# Altium PCB Pulsometro.PcbDoc
Units mil, origin at the board's own origin, x right, y up, seen from the top; angles counter-clockwise.
Board outline 6000 x 4000 mil, 2 copper layers (Top Layer, Bottom Layer); 21 components, 12 nets, 194 pads, 1 vias.
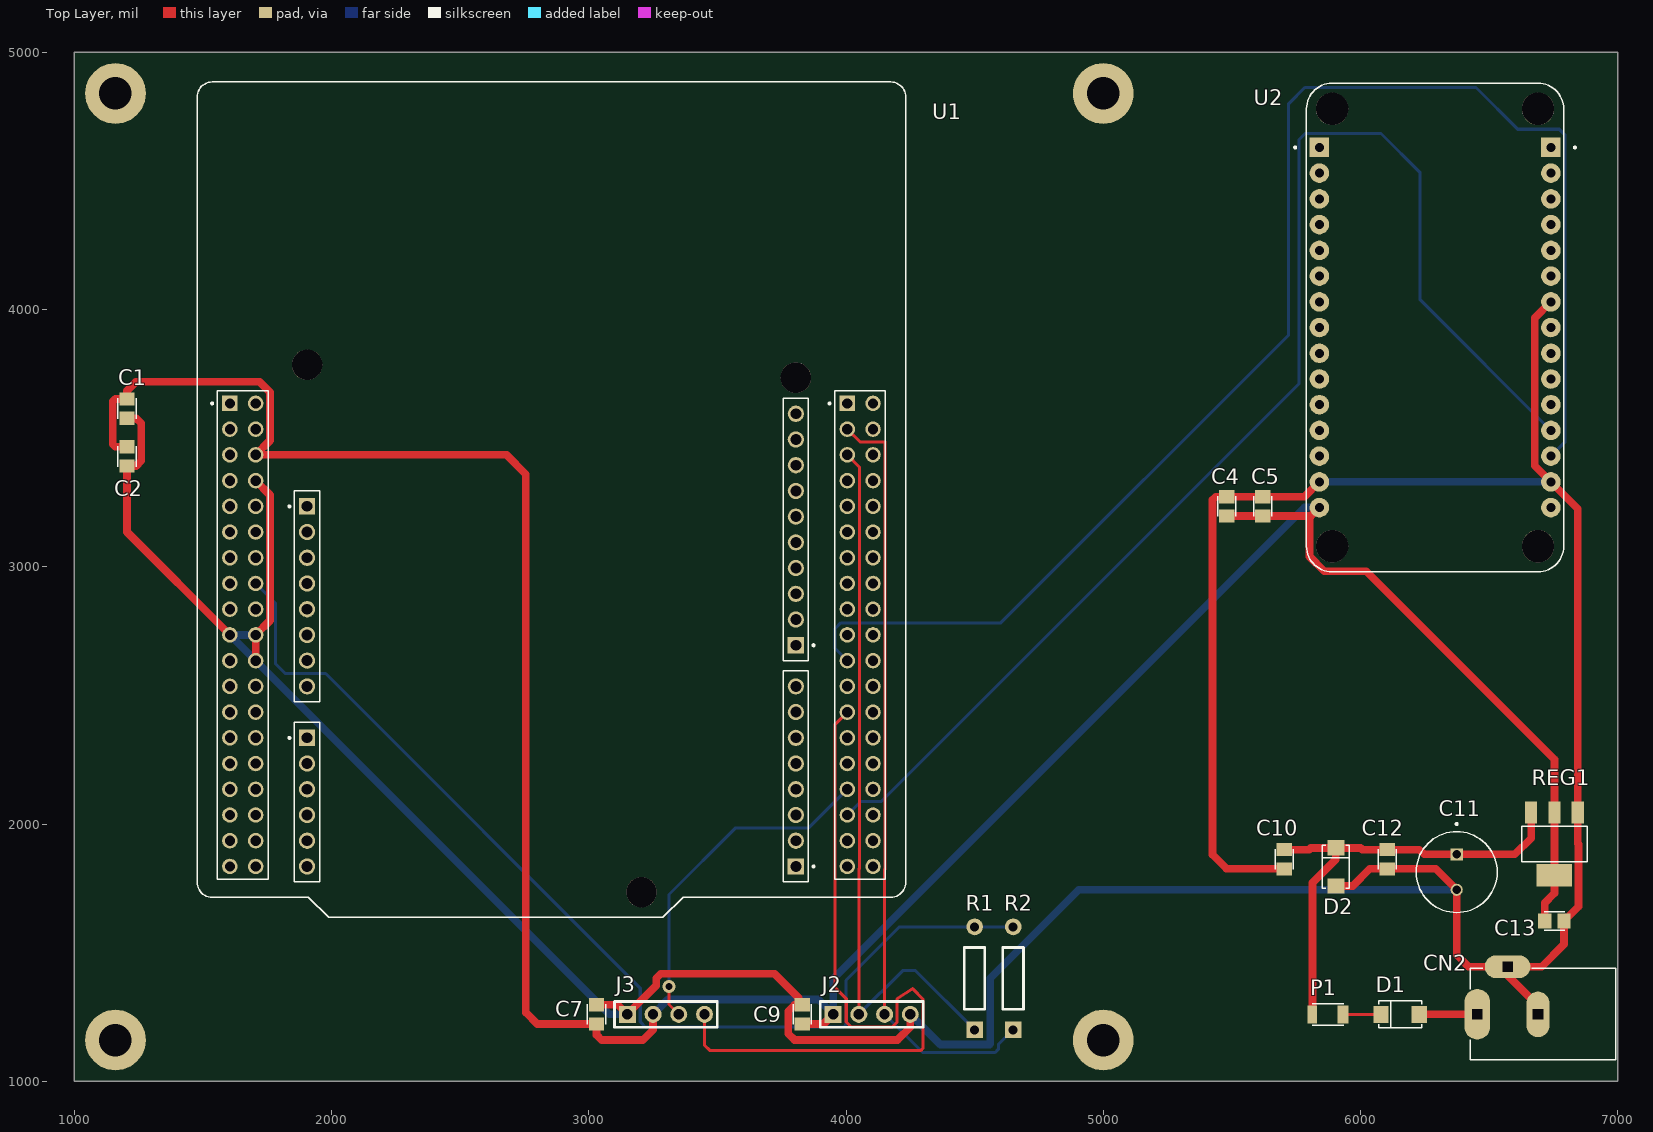
[diagram p0: Top Layer view]
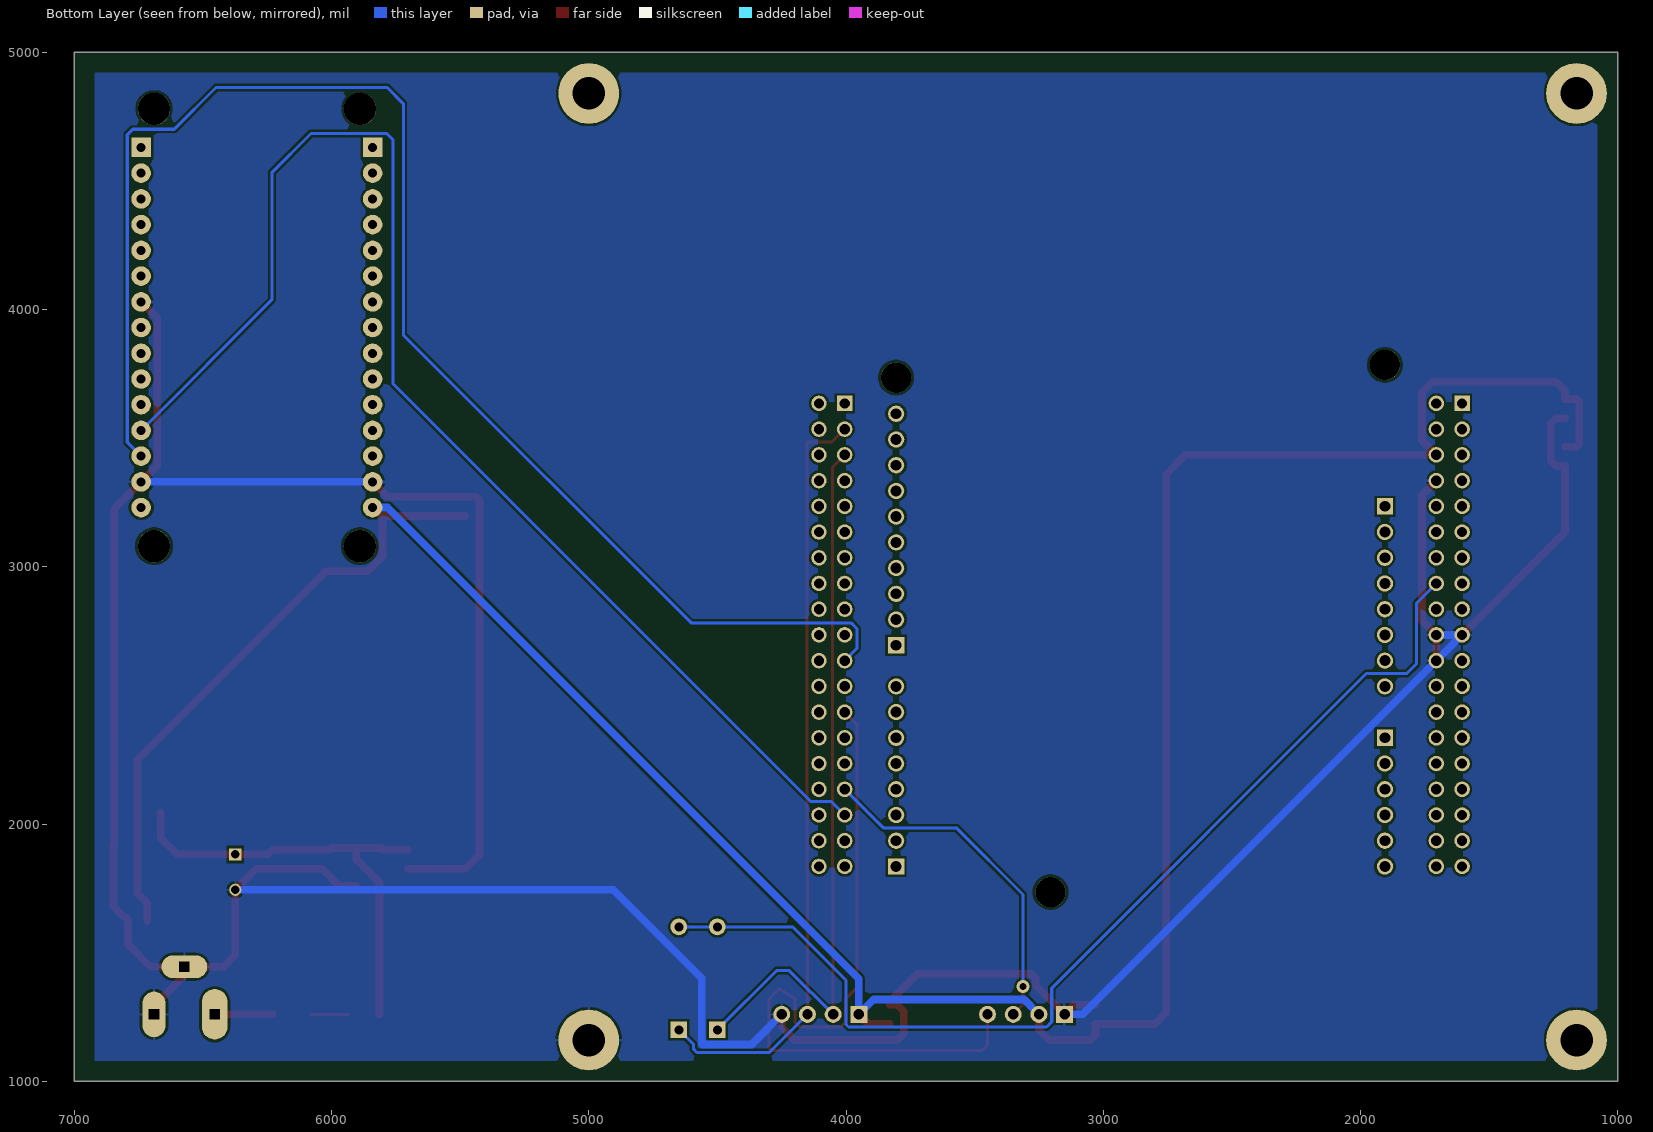
[diagram p1: Bottom Layer view, seen from below]
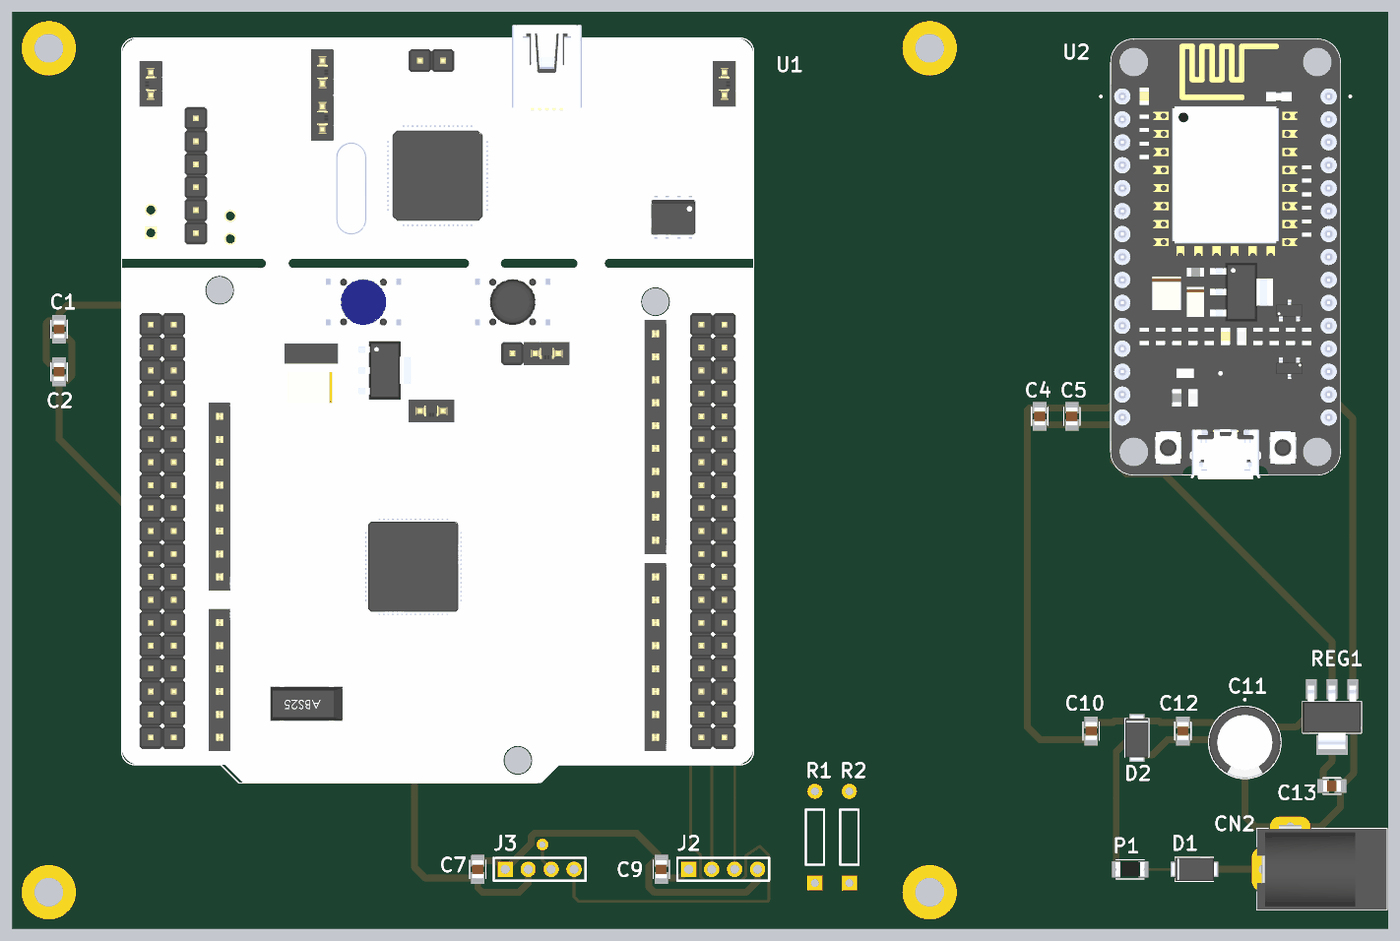
[diagram p2: 3D render of the assembled board from above, using the file's embedded part models]

## Layer stack, top to bottom
Top Solder: solder mask 0.4, Solder Resist, Dk 3.5
Top Layer: signal copper 1.4
Dielectric 1: dielectric 12.6, FR-4, Dk 4.8
Bottom Layer: signal copper 1.4
Bottom Solder: solder mask 0.4, Solder Resist, Dk 3.5

## Board outline
1000,1000 7000,1000 7000,5000 1000,5000

## Design rules (kind name [scope] priority, off if disabled: settings)
BoardOutlineClearance [OnCopper] p1: gap=78.74 ignorepadtopadclearanceinfootprint=FALSE except(0: Text-OutlineEdge; 10: SMDPad-OutlineEdge THPad-OutlineEdge)
Clearance [All] p1: gap=10 ignorepadtopadclearanceinfootprint=FALSE
HoleSize [All] p1: absolutevalues=TRUE maxlimit=200 minlimit=1 maxpercent=80.000 minpercent=20.000
PolygonConnect [All] p1: connectstyle=Relief reliefconductorwidth=10 reliefentries=4 polygonreliefangle="90 Angle" airgapwidth=10
RoutingVias [All] p1: holewidth=28 width=50 viastyle="Through Hole" minholewidth=28 minwidth=50 maxholewidth=28 maxwidth=50
SilkToSolderMaskClearance [IsPad] p1: minsilkscreentomaskgap=0 clearancetoexposedcopper=TRUE
SolderMaskExpansion [All] p1: expansion=0 istentingtop=FALSE
SupplyNets "Schematic Supply Nets_3" [InNet('+3V3')] p1: voltage=0.000
SupplyNets "Schematic Supply Nets_2" [InNet('+9V')] p2: voltage=0.000
SupplyNets "Schematic Supply Nets_1" [InNet('GND')] p3: voltage=0.000
SupplyNets "Schematic Supply Nets" [InNet('+5V')] p4: voltage=0.000
Width Width_Power [InNet('+9V') or InNet('NetC10_1') or InNet('+5V') or InNet('GND')] p1: maxlimit=50 minlimit=20 preferedwidth=30
Width [All] p2: maxlimit=50 minlimit=10 preferedwidth=12
28 further rules are at their usual default settings.

## Classes and differential pairs
component class Power: C10 C11 C12 C13 CN2 D1 D2 P1 REG1
component class HeartRate_SpO2_Monitor: U1
component class Alimentacion_Modulos: C1 C2 C4 C5 C7 C9 J2 J3 R1 R2 U2

## Components (designator, comment, footprint, x,y, rotation, side; value= is the part's Value field where it differs from the comment)
C1 "10µF 16 V X7R" C0805 1205,3615 r270 top locked
C2 "100 nF 50 V X7R" C0805 1205,3429 r270 top locked
C4 "10 µF 16 V X7R" C0805 5480,3235 r90 top locked
C5 "100 nF 50 V X7R" C0805 5620,3235 r90 top locked
C7 "100 nF 50 V X7R" C0805 3030,1260 r90 top locked
C9 "100 nF 50 V X7R" C0805 3830,1260 r90 top locked
C10 "100nF 50V X7R" C0805 5704,1863 r270 top locked
C11 "220uF 35V Elect" "Capacitor radial 8x11.5" 6374,1813 r270 top locked
C12 "1uF 25V X7R" C0805 6104,1863 r270 top locked
C13 "1uF 25V X7R" C0805 6754,1623 r0 top locked
CN2 "PJ-002BH" PJ-002BH 6454,1260 r0 top locked
D1 "S1G" "SMA (DO-214AC)" 6154,1260 r180 top locked
D2 "SMAJ12A" "SMA (DO-214AC)" 5904,1833 r90 top locked
J2 "Sensor MAX30102" CONN_1x4_2.54 4100,1260 r0 top locked
J3 "LCD 16x2 I2C" CONN_1x4_2.54 3300,1260 r0 top locked
P1 "NANOSMDC075F-2" NANOSMDC016F 5874,1260 r180 top locked
R1 "4k7 (DNP)" RES_AXIAL_P400 4500,1400 r90 top locked
R2 "4k7 (DNP)" RES_AXIAL_P400 4650,1400 r90 top locked
REG1 "LM7805" "SOT 223" 6754,1923 r180 top locked
U1 "NUCLEO-F446RE" MODULE_NUCLEO-F446RE 2855,3260.59 r0 top
U2 "" SEEED_113990105 6290,3930 r0 top locked

## Footprints (in the part's own frame and the unit in brackets; to place one, negate y for a bottom-side part, rotate by r counter-clockwise, add the part's x,y. Pads: shape width x height; smd on the part's side, far side on the other; paste and mask are expansions set on the pad)
C0805 [mm] "Capacitor 0805 (2012 mm)"
  rect 1.3x1.5 smd: 1(-0.95,0) 2(0.95,0)
  silkscreen extent -1,-0.9 1,0.9, body extent -1,-0.63 1,0.63, height 1.45
"Capacitor radial 8x11.5" [mm]
  rect 1.2x1.2 hole 0.85: 1(-1.75,0)
  round 1.2 hole 0.85: 2(1.75,0)
  silkscreen extent -4.85,-4 4,4, body extent -4,-4 4,4, height 11.5
CONN_1x4_2.54 [mil] "Tira de pines 1x4 paso 2.54 mm"
  rect 66x66 hole 40: 1(-150,0)
  round 66 hole 40: 2(-50,0) 3(50,0) 4(150,0)
  silkscreen extent -200,-50 200,50
MODULE_NUCLEO-F446RE [mm]
  rect 1.605x1.605 / inner round 1.605 / far side rect 1.605x1.605 hole 1.07: CN5_1(24.13,-14.37) CN6_1(-24.13,-0.65) CN8_1(-24.13,-23.51) CN9_1(24.13,-36.21)
  round 1.605 hole 1.07: CN5_2(24.13,-11.83) CN5_3(24.13,-9.29) CN5_4(24.13,-6.75) CN5_5(24.13,-4.21) CN5_6(24.13,-1.67) CN5_7(24.13,0.87) CN5_8(24.13,3.41) CN5_9(24.13,5.95) CN5_10(24.13,8.49) CN6_2(-24.13,-3.19) CN6_3(-24.13,-5.73) CN6_4(-24.13,-8.27) CN6_5(-24.13,-10.81) CN6_6(-24.13,-13.35) CN6_7(-24.13,-15.89) CN6_8(-24.13,-18.43) CN8_2(-24.13,-26.05) CN8_3(-24.13,-28.59) CN8_4(-24.13,-31.13) CN8_5(-24.13,-33.67) CN8_6(-24.13,-36.21) CN9_2(24.13,-33.67) CN9_3(24.13,-31.13) CN9_4(24.13,-28.59) CN9_5(24.13,-26.05) CN9_6(24.13,-23.51) CN9_7(24.13,-20.97) CN9_8(24.13,-18.43)
  rect 1.53x1.53 / inner round 1.53 / far side rect 1.53x1.53 hole 1.02: CN7_1(-31.75,9.51) CN10_1(29.21,9.51)
  round 1.53 hole 1.02: CN7_2(-29.21,9.51) CN7_3(-31.75,6.97) CN7_4(-29.21,6.97) CN7_5(-31.75,4.43) CN7_6(-29.21,4.43) CN7_7(-31.75,1.89) CN7_8(-29.21,1.89) CN7_9(-31.75,-0.65) CN7_10(-29.21,-0.65) CN7_11(-31.75,-3.19) CN7_12(-29.21,-3.19) CN7_13(-31.75,-5.73) CN7_14(-29.21,-5.73) CN7_15(-31.75,-8.27) CN7_16(-29.21,-8.27) CN7_17(-31.75,-10.81) CN7_18(-29.21,-10.81) CN7_19(-31.75,-13.35) CN7_20(-29.21,-13.35) CN7_21(-31.75,-15.89) CN7_22(-29.21,-15.89) CN7_23(-31.75,-18.43) CN7_24(-29.21,-18.43) CN7_25(-31.75,-20.97) CN7_26(-29.21,-20.97) CN7_27(-31.75,-23.51) CN7_28(-29.21,-23.51) CN7_29(-31.75,-26.05) CN7_30(-29.21,-26.05) CN7_31(-31.75,-28.59) CN7_32(-29.21,-28.59) CN7_33(-31.75,-31.13) CN7_34(-29.21,-31.13) CN7_35(-31.75,-33.67) CN7_36(-29.21,-33.67) CN7_37(-31.75,-36.21) CN7_38(-29.21,-36.21) CN10_2(31.75,9.51) CN10_3(29.21,6.97) CN10_4(31.75,6.97) CN10_5(29.21,4.43) CN10_6(31.75,4.43) CN10_7(29.21,1.89) CN10_8(31.75,1.89) CN10_9(29.21,-0.65) CN10_10(31.75,-0.65) CN10_11(29.21,-3.19) CN10_12(31.75,-3.19) CN10_13(29.21,-5.73) CN10_14(31.75,-5.73) CN10_15(29.21,-8.27) CN10_16(31.75,-8.27) CN10_17(29.21,-10.81) CN10_18(31.75,-10.81) CN10_19(29.21,-13.35) CN10_20(31.75,-13.35) CN10_21(29.21,-15.89) CN10_22(31.75,-15.89) CN10_23(29.21,-18.43) CN10_24(31.75,-18.43) CN10_25(29.21,-20.97) CN10_26(31.75,-20.97) CN10_27(29.21,-23.51) CN10_28(31.75,-23.51) CN10_29(29.21,-26.05) CN10_30(31.75,-26.05) CN10_31(29.21,-28.59) CN10_32(31.75,-28.59) CN10_33(29.21,-31.13) CN10_34(31.75,-31.13) CN10_35(29.21,-33.67) CN10_36(31.75,-33.67) CN10_37(29.21,-36.21) CN10_38(31.75,-36.21)
  round 3 hole 3 unplated: ""(-24.13,13.32) ""(8.89,-38.75) ""(24.13,12.05)
  silkscreen extent -35,-41.25 35,41.25, body extent -35,-41.25 35,42.7, height 12.28
NANOSMDC016F [mm]
  rect 1.09x1.77 smd: 1(-1.465,0)
  rect 0.94x1.77 smd: 2(1.54,0)
  silkscreen extent -1.55,-1.07 1.55,1.07, body extent -1.6,-0.79 1.6,0.79, height 0.67
PJ-002BH [mm] "Power Jack"
  oval 2.5x5 hole 1 square: 1(0,0)
  oval 2.25x4.5 hole 1 square: 2(6,0)
  oval 4.5x2.25 hole 1 square: 3(3,4.7)
  silkscreen extent -0.7,-4.5 13.7,4.55, body extent -0.7,-4.5 13.7,4.9, height 11
RES_AXIAL_P400 [mil] "Resistencia axial 1/4 W paso 400 mil"
  rect 65x65 hole 35: 1(-200,0)
  round 65 hole 35: 2(200,0)
  silkscreen extent -120,-40 120,40
SEEED_113990105 [mm]
  rect 1.93x1.93 / inner round 1.93 / far side rect 1.93x1.93 hole 0.889: J1_1(-11.43,17.78) J2_1(11.43,17.78)
  round 1.93 hole 0.889: J1_2(-11.43,15.24) J1_3(-11.43,12.7) J1_4(-11.43,10.16) J1_5(-11.43,7.62) J1_6(-11.43,5.08) J1_7(-11.43,2.54) J1_8(-11.43,0) J1_9(-11.43,-2.54) J1_10(-11.43,-5.08) J1_11(-11.43,-7.62) J1_12(-11.43,-10.16) J1_13(-11.43,-12.7) J1_14(-11.43,-15.24) J1_15(-11.43,-17.78) J2_2(11.43,15.24) J2_3(11.43,12.7) J2_4(11.43,10.16) J2_5(11.43,7.62) J2_6(11.43,5.08) J2_7(11.43,2.54) J2_8(11.43,0) J2_9(11.43,-2.54) J2_10(11.43,-5.08) J2_11(11.43,-7.62) J2_12(11.43,-10.16) J2_13(11.43,-12.7) J2_14(11.43,-15.24) J2_15(11.43,-17.78)
  round 3.2 hole 3.2 unplated: ""(-10.16,-21.59) ""(-10.16,21.59) ""(10.16,-21.59) ""(10.16,21.59)
  silkscreen extent -13.91,-24.13 13.91,24.13, body extent -12.7,-24.65 12.7,24.13, height 7
"SMA (DO-214AC)" [mm] "TVS diode SMA (DO-214AC)"
  rect 1.52x1.68 smd: 1(-1.88,0) 2(1.88,0)
  silkscreen extent -2.13,-1.33 2.13,1.33, body extent -2.57,-1.28 2.57,1.28, height 2.5
"SOT 223" [mm] "SOT 223"
  rect 1.2x2.2 smd: 1(-2.3,-3.1) 2(0,-3.1) 3(2.3,-3.1)
  rect 3.5x2.2 smd: 2(0,3.1)
  silkscreen extent -3.25,-1.75 3.25,1.75, body extent -3.25,-3.5 3.25,3.5, height 1.8

## Part data
C1 C2 C4 C5 C7 C9 C10 C12 C13: library part Capacitor, "Non polarized capacitor"
C11: library part "Polarized Capacitor", "Polarized capacitor"
CN2: library part "Power Jack", "3 pins jack"
D1: library part "Schottky Diode", "Schottky diode"
D2: library part TVS, "Transient voltage suppression diode"
J2: library part CONN_SENSOR_MAX30102, "Conector 1x4 para modulo MAX30102 (VIN SDA SCL GND)"
J3: library part CONN_LCD_I2C, "Conector 1x4 para LCD 16x2 con backpack I2C (GND VCC SDA SCL)"
P1: library part Polyswitch, "Polyswitch"
R1 R2: library part RES, "Resistencia"
REG1: library part LM78xx, "Voltage regulator"
U1: "STM32F446RE, mbed-Enabled Development Nucleo-64 STM32F4 ARMÂ® CortexÂ®-M4 MCU 32-Bit Embedded Evaluation Board", Package=None, Check_prices=https://www.snapeda.com/parts/NUCLEO-F446RE/STMicroelectronics/view-part/?ref=eda, MF=STMicroelectronics, MP=NUCLEO-F446RE, SnapEDA_Link=https://www.snapeda.com/parts/NUCLEO-F446RE/STMicroelectronics/view-part/?ref=snap
U2: library part 113990105, "An open-source firmware and development kit that helps you to Prototype your IOT product within a few Lua script lines", Package=None, Check_prices=https://www.snapeda.com/parts/NodeMCU%20v2/Seeed+Technology+Co.%252C+Ltd/view-part/?ref=eda, MF="Seeed Technology", MP="NodeMCU v2", SnapEDA_Link=https://www.snapeda.com/parts/NodeMCU%20v2/Seeed+Technology+Co.%252C+Ltd/view-part/?ref=snap

## Free pads (board coordinates)
  round 236 hole 126 unplated: H1(1160,1160) H2(1160,4840) H3(5000,4840)
  round 236 hole 126: H4(5000,1160)

## Via types
v1: diameter 50, hole 28, Top Layer to Bottom Layer, 1 vias

## Nets (pads, with @x,y where several pads share a name; then routed paths per layer and width w, separated by ;. In a path a pad name is that pad's centre, name@x,y a point inside that pad or via, vN(x,y) a via of type N, cw(c..) or ccw(c..) an arc to the next point about the centre after c; other vN are vias at no path point)
+3V3: R1.2 R2.2 U1.CN7_16 | length 4134.8
  Bottom Layer w12: U1.CN7_16 1782,2858 1782,2623 1820,2585 1977,2585 3200,1362 3200,1231 3220,1211 3990,1211 4000,1221 4000,1392 4208,1600 R1.2 R2.2
+5V: C1.1 C2.1 C4.1 C5.1 C7.1 C9.1 C13.1 J2.1 J3.2 REG1.2 U1.CN7_6 U2.J1_15 | length 11110.1
  Top Layer w30: C2.1 1160,3466.4 1150,3476.4 1150,3642.4 1160,3652.4 C1.1 1205,3684 1240,3719 1720,3719 1761,3678 1761,3491 U1.CN7_6 2680,3435 2755,3360 2755,1267.6 2800,1222.6 C7.1 3030,1180 3050,1160 3210,1160 3250,1200 J3.2 ; C9.1 3912.6,1222.6 J2.1 ; C4.1 C5.1 5807.6,3197.6 ; U2.J1_15 5807.6,3197.6 ; C13.1 6716.6,1693 6754,1730.4 6754,1800.95 6754,2045.05 6754,2251 6022,2983 5859,2983 5802,3040 5802,3192 5807.6,3197.6
  Bottom Layer w30: J3.2 3308,1318 3892,1318 J2.1 3950,1398 5782,3230 U2.J1_15
+9V: CN2.1 D1.1 | length 226
  Top Layer w30: D1.1 CN2.1
GND: C1.2 C2.2 C4.2 C5.2 C7.2 C9.2 C10.2 C11.2 C12.2 C13.2 CN2.2 CN2.3 D2.1 J2.4 J3.1 pad.H4 REG1.1 U1.CN7_8 U1.CN7_19 U1.CN7_20 U1.CN7_22 U2.J1_14 U2.J2_7 U2.J2_14 | length 15470.2
  Top Layer w30: C1.2 1240,3577.6 1260,3557.6 1260,3411.6 1240,3391.6 C2.2 1205,3135 U1.CN7_19 ; U1.CN7_22 U1.CN7_20 1761,2791 1761,3279 U1.CN7_8 ; C7.2 3112.6,1297.4 J3.1 3262,1372 3262,1400 3280,1418 3722,1418 3815.47,1324.53 3815.47,1307.99 3826.06,1297.4 C9.2 3800,1297.4 3775,1272.4 3775,1185.21 3800,1160.21 4200,1160.21 4250,1210.21 J2.4 ; C10.2 5479.4,1825.6 5425,1880 5425,3260 5437.4,3272.4 C4.2 C5.2 5782.4,3272.4 U2.J1_14 ; D2.1 5970,1758.98 6036.61,1825.6 C12.2 6292.5,1825.6 C11.2 6374,1491 6419.96,1445.04 CN2.3 ; CN2.2 6690.22,1293 6572.11,1411.11 CN2.3 ; U2.J2_7 6677,3967 6677,3393 U2.J2_14 6844.55,3225.45 REG1.1 6844.55,1924.45 6848,1921 6848,1679.6 6805.93,1637.53 6801.99,1637.53 6791.4,1626.94 6791.4,1532.44 6704,1445.04 CN2.3
  Bottom Layer w30: U1.CN7_20 U1.CN7_19 U1.CN7_22 3080,1260 J3.1 ; J2.4 4367.5,1142.5 4558,1142.5 4561.25,1145.75 4561.25,1400 4905.35,1744.1 C11.2 ; U2.J1_14 U2.J2_14
I2C1_SCL: J2.3 R2.1 U1.CN10_3 | length 3002
  Top Layer w12: U1.CN10_3 4055,3485 4151,3485 4152,3484 4152,1826 4150,1824 J2.3
  Bottom Layer w12: J2.3 4298.5,1111.5 4580,1111.5 4592.5,1124 4592.5,1142.5 R2.1
I2C1_SDA: J2.2 R1.1 U1.CN10_5 | length 2811
  Top Layer w12: U1.CN10_5 4052,3388 4052,1826 4050,1824 J2.2
  Bottom Layer w12: J2.2 4220,1430 4270,1430 R1.1
I2C2_SCL: J3.4 U1.CN10_25 | length 2847.9
  Top Layer w12: J3.4 3450,1140 3470,1120 4291.97,1120 4299,1127.03 4299,1320 4259,1360 4199,1320 4199,1230 4180,1211 4020,1211 4001,1230 4001,1321 3958,1364 3958,2388 U1.CN10_25
I2C2_SDA: J3.3 U1.CN10_31 | length 1344.2
  Top Layer w12: v1(3312,1368) 3312,1298 J3.3
  Bottom Layer w12: v1(3312,1368) 3312,1726 3571,1985 3855,1985 U1.CN10_31
NetC10_1: C10.1 C11.1 C12.1 D2.2 P1.2 REG1.3 | length 1783.1
  Top Layer w30: C10.1 5800,1900.4 5806.61,1907.02 D2.2 ; P1.2 5813.37,1771.37 5904,1862 D2.2 ; REG1.3 6663.45,1945.35 6600,1881.9 C11.1 6247.5,1881.9 6229,1900.4 C12.1 6006.61,1900.4 6000,1907.02 D2.2
NetD1_2: D1.2 P1.1 | length 148.3
  Top Layer w12: P1.1 D1.2
UART_NUC_RX: U1.CN10_33 U2.J2_12 | length 5155.5
  Bottom Layer w12: U1.CN10_33 4058,2088 4138,2088 5761,3711 5761,4660 5785,4684 6080,4684 6232,4532 6232,4038 U2.J2_12
UART_NUC_TX: U1.CN10_21 U2.J2_13 | length 5726.3
  Bottom Layer w12: U1.CN10_21 3958,2682 3958,2760 3980,2782 4602,2782 5721,3901 5721,4800 5784,4863 6449,4863 6611,4701 6773,4701 6794,4680 6794,3484 U2.J2_13
pads on no net: U1. U1.CN5_1 U1.CN5_2 U1.CN5_3 U1.CN5_4 U1.CN5_5 U1.CN5_6 U1.CN5_7 U1.CN5_8 U1.CN5_9 U1.CN5_10 U1.CN6_1 U1.CN6_2 U1.CN6_3 U1.CN6_4 U1.CN6_5 U1.CN6_6 U1.CN6_7 U1.CN6_8 U1.CN7_1 U1.CN7_2 U1.CN7_3 U1.CN7_4 U1.CN7_5 U1.CN7_7 U1.CN7_9 U1.CN7_10 U1.CN7_11 U1.CN7_12 U1.CN7_13 U1.CN7_14 U1.CN7_15 U1.CN7_17 U1.CN7_18 U1.CN7_21 U1.CN7_23 U1.CN7_24 U1.CN7_25 U1.CN7_26 U1.CN7_27 U1.CN7_28 U1.CN7_29 U1.CN7_30 U1.CN7_31 U1.CN7_32 U1.CN7_33 U1.CN7_34 U1.CN7_35 U1.CN7_36 U1.CN7_37 U1.CN7_38 U1.CN8_1 U1.CN8_2 U1.CN8_3 U1.CN8_4 U1.CN8_5 U1.CN8_6 U1.CN9_1 U1.CN9_2 U1.CN9_3 U1.CN9_4 U1.CN9_5 U1.CN9_6 U1.CN9_7 U1.CN9_8 U1.CN10_1 U1.CN10_2 U1.CN10_4 U1.CN10_6 U1.CN10_7 U1.CN10_8 U1.CN10_9 U1.CN10_10 U1.CN10_11 U1.CN10_12 U1.CN10_13 U1.CN10_14 U1.CN10_15 U1.CN10_16 U1.CN10_17 U1.CN10_18 U1.CN10_19 U1.CN10_20 U1.CN10_22 U1.CN10_23 U1.CN10_24 U1.CN10_26 U1.CN10_27 U1.CN10_28 U1.CN10_29 U1.CN10_30 U1.CN10_32 U1.CN10_34 U1.CN10_35 U1.CN10_36 U1.CN10_37 U1.CN10_38 U2. U2.J1_1 U2.J1_2 U2.J1_3 U2.J1_4 U2.J1_5 U2.J1_6 U2.J1_7 U2.J1_8 U2.J1_9 U2.J1_10 U2.J1_11 U2.J1_12 U2.J1_13 U2.J2_1 U2.J2_2 U2.J2_3 U2.J2_4 U2.J2_5 U2.J2_6 U2.J2_8 U2.J2_9 U2.J2_10 U2.J2_11 U2.J2_15

## Polygon pours and split planes (outlines as drawn)
GND on Bottom Layer "GND_Bottom" (solid, remove dead copper, pour order 0): 1000,1000 7000,1000 7000,5000 1000,5000